# Altium PCB ublox_gnss_node.PcbDoc (part 3 of 5)
Units mm, origin at the board's own origin, x right, y up, seen from the top; angles counter-clockwise.
Board outline 84 x 108.04 mm, 6 copper layers (Top Layer (HSig), L2 GND, L3 Signal X, L4 PWR, L5 GND, Bottom Layer (Y)), stack 1.538 mm thick; 222 components, 159 nets, 892 pads, 1025 vias.
Unrouted connection lines stored in the file: 345.
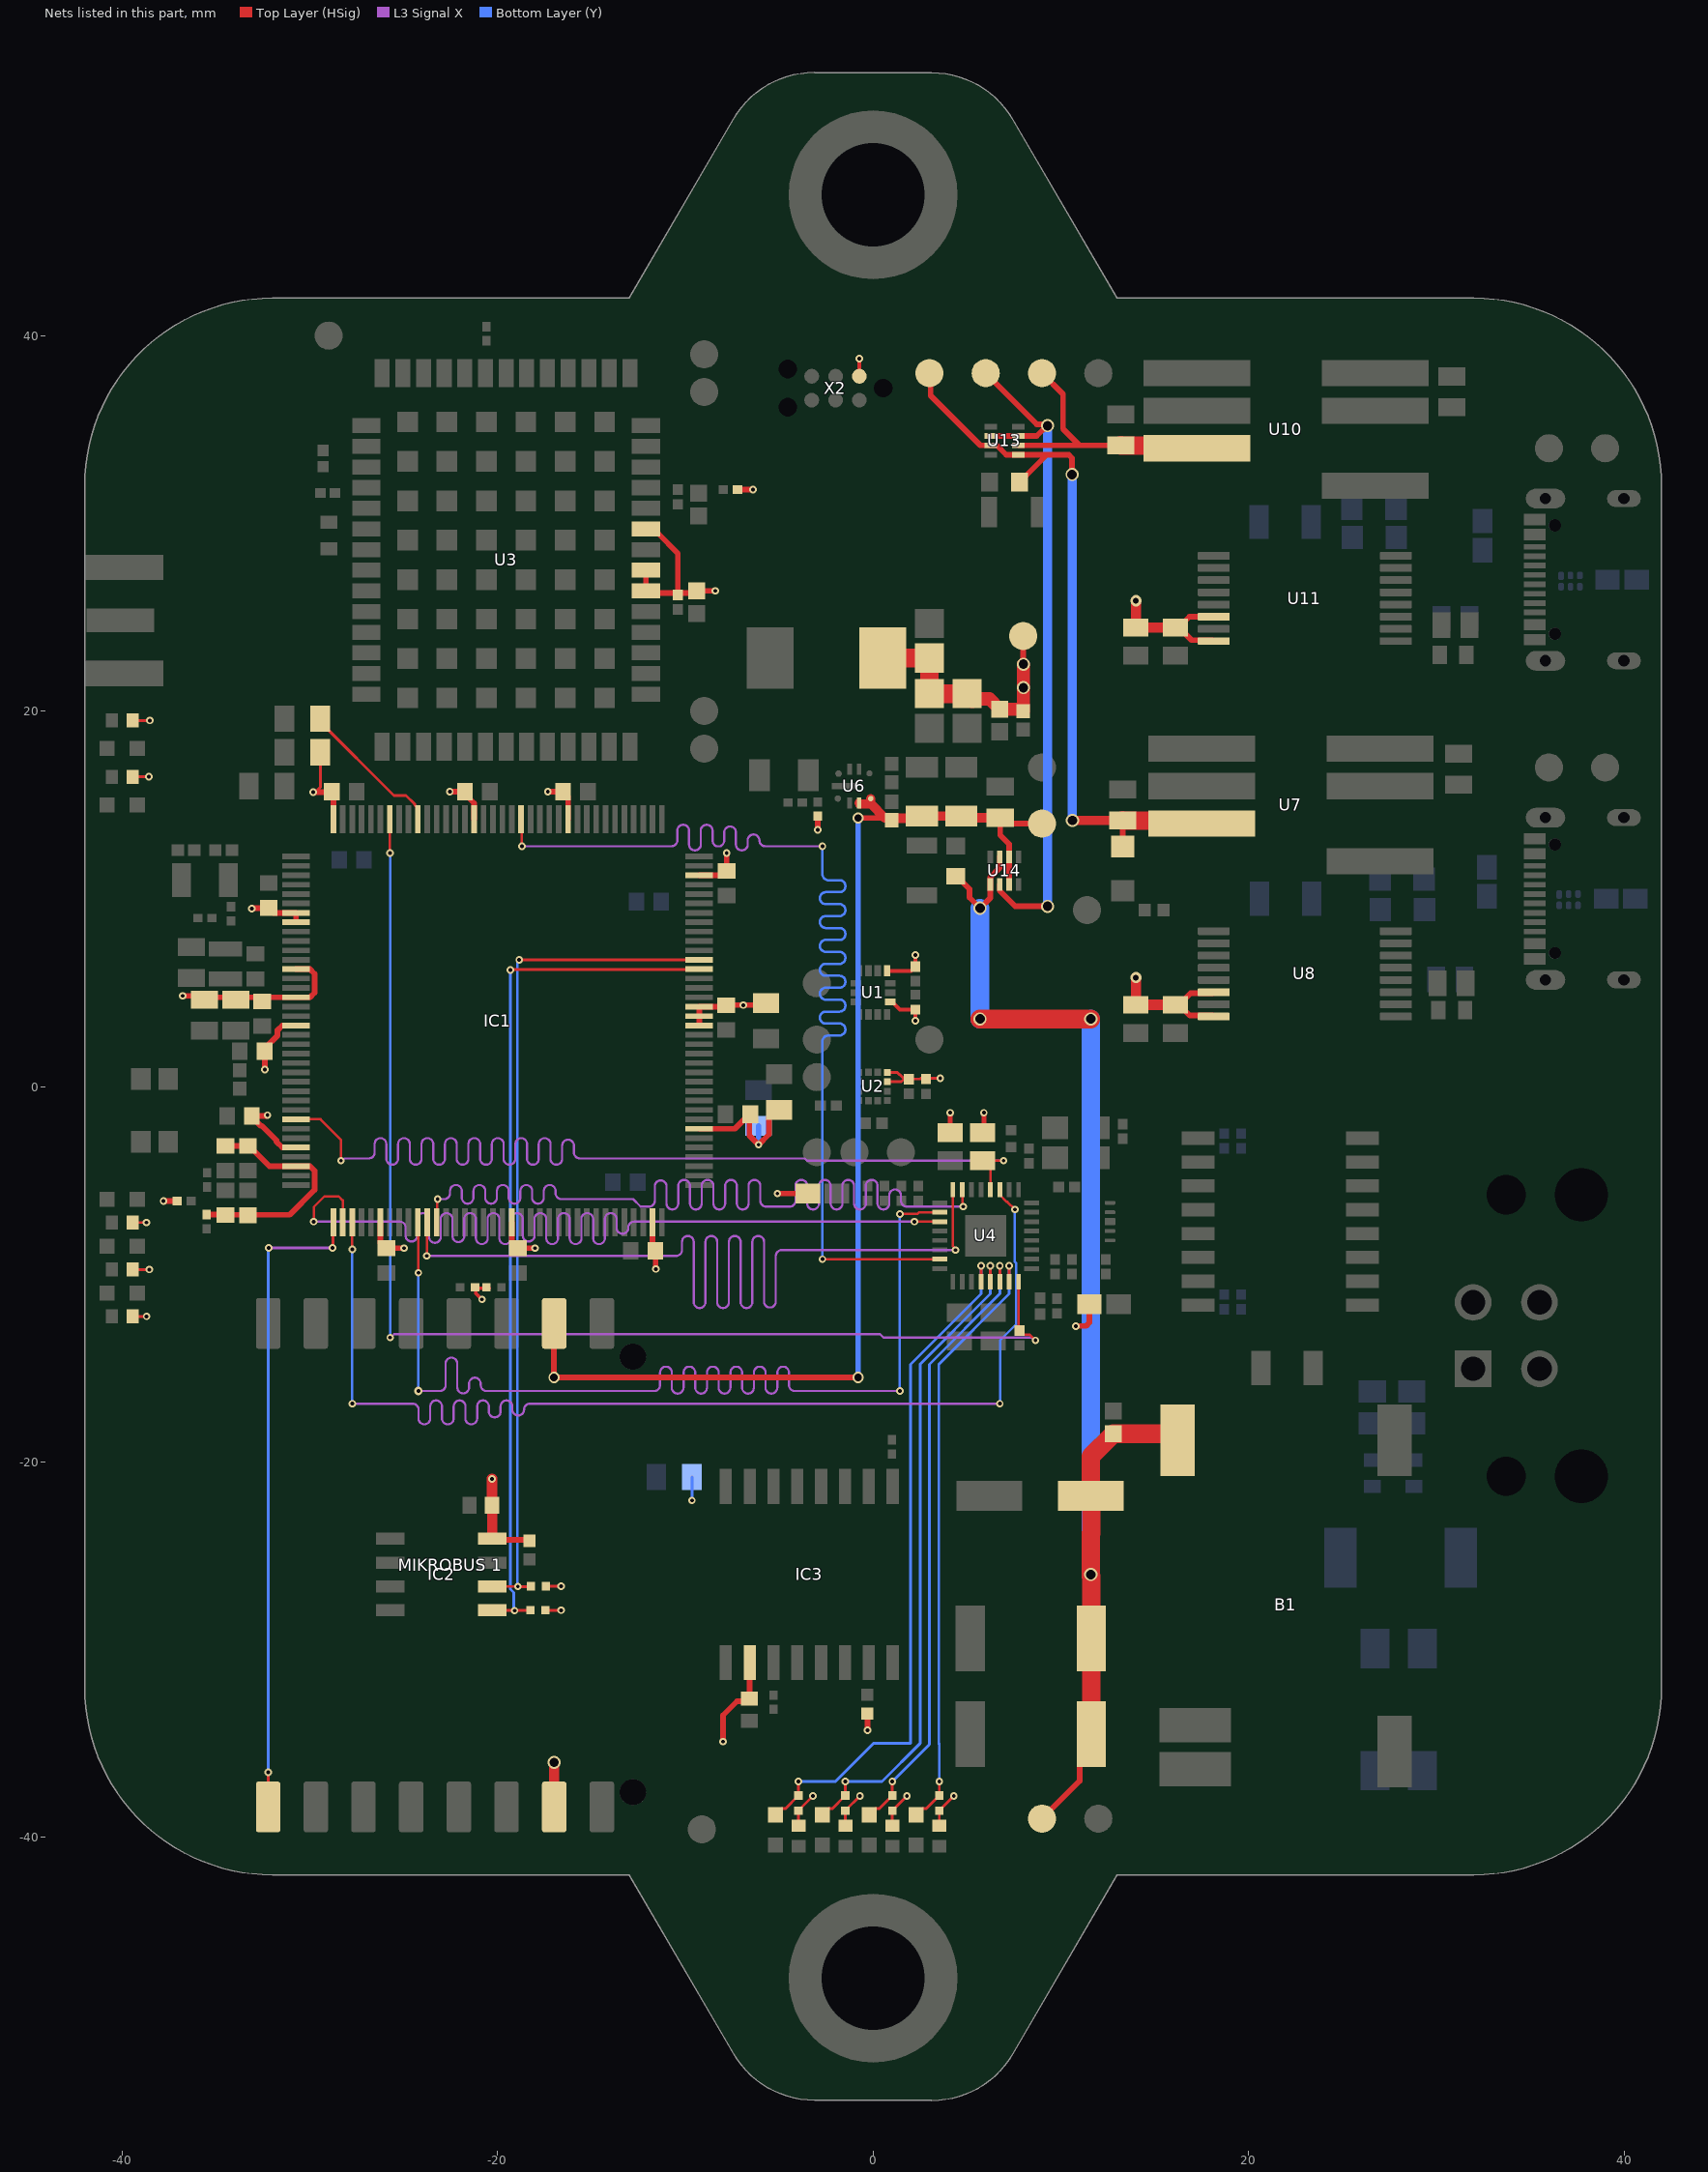
[diagram p6: the nets of this part, all layers, seen from the top]

## Part data (continued)
SW1: library part CMP-2000-06231-1, "Light Touch Switch, 100 mOhm, -40 to 85 degC, 4-Pin SMD, RoHS, Tape and Reel", Actuator Color=Black, Contact Rating @ Voltage=0.02@1+5VDCA, Dielectric Strength=250VAC, Manufacturer=Panasonic, Maximum AC Voltage Rating=N/A, Maximum Contact Resistance=100mOhm, Maximum DC Voltage Rating=1+5V, Minimum Insulation Resistance=100MOhm, Operating Force=1N, Operating Temperature=-40to85C, Package Description="4-Pin Surface Mount Device, Body 2.9 x 3.5 mm, Pitch 1.45 mm", Package Reference=EVPAA, Supplier Part Number=P13347SDKR-ND, Actuator Length=0.3mm, Actuator Style=RectangularButton, Base Material=N/A, Body Orientation=Straight, Category="Tactile Switches", ComponentLink1Description=https://datasheet.ciiva.com/24076/atk0000pe184-69004-24076293.pdf?src-supplier=Mouser, ComponentLink1URL=https://datasheet.ciiva.com/24076/atk0000pe184-69004-24076293.pdf?src-supplier=Mouser, ComponentLink2Description=https://datasheet.ciiva.com/2899/atk0000ce26-2899990.pdf?src-supplier=Digikey, ComponentLink2URL=https://datasheet.ciiva.com/2899/atk0000ce26-2899990.pdf?src-supplier=Digikey, ComponentLink3Description=https://datasheet.ciiva.com/2899/atk0000ce26-2899991.pdf?src-supplier=Digikey, ComponentLink3URL=https://datasheet.ciiva.com/2899/atk0000ce26-2899991.pdf?src-supplier=Digikey, ComponentLink4Description=https://datasheet.ciiva.com/2899/atk0000ce26-2899992.pdf?src-supplier=Digikey, ComponentLink4URL=https://datasheet.ciiva.com/2899/atk0000ce26-2899992.pdf?src-supplier=Digikey, Contact Material=N/A, Contact Plating=N/A, COO=JP, Datasheet URL=https://industrial.panasonic.com/cdbs/www-data/pdf/ATV0000/ATV0000C1.pdf, Datasheet Version=04/2016, Dimension=4.3x2.9x1.7mm, ECCN=EAR99, Electrical Life=1000000Cycles, Family=EVPAA, Ground Terminal=No, Housing Material=N/A, HTS=8507204000, Illumination Type=N/R, Manufacturer Part Number=EVP-AA002K, Manufacturer URL=http://www.panasonic.com/, Mechanical Life=N/A, Mounting=SurfaceMount,J-Bend, Mounting Technology=SurfaceMount, Packaging=EmbossedTapeandReel, Part No=EVP-AA002K, Pole Throw Configuration=SPST, Pricing="1=0.8, 10=0.774, 25=0.744, 100=0.6459, 250=0.5894, 500=0.54772, 1000=0.49116, 2500=0.46139 (USD)", Product Weight=N/A, RoHS=Yes, Seal Description=N/A, Seal Location=N/A, Stock=749, Supplier=PanasonicIndustrialDevices, Supplier Standard Pack=5,000, Switch Configuration=N.O., Type=LightTouch
T1: "Telecom Transformer 1: 1 1.4Ohm Prim. DCR 1Ohm Sec. DCR 16 Terminal Gull Wing SMD Automotive", Manufacturer=Bourns, Max Operating Temperature=125°C, Min Operating Temperature=-40°C, Supplier Part Number=118-SM91072AL-ECT-ND, Category=Uncategorized, ComponentLink1Description=http://www.farnell.com/datasheets/2169310.pdf?src-supplier=Farnell, ComponentLink1URL=http://www.farnell.com/datasheets/2169310.pdf?src-supplier=Farnell, ComponentLink2Description=https://www.bourns.com/docs/Product-Datasheets/sm13072apel.pdf?src-supplier=Digi-Key, ComponentLink2URL=https://www.bourns.com/docs/Product-Datasheets/sm13072apel.pdf?src-supplier=Digi-Key, ComponentLink3Description=http://www.farnell.com/datasheets/2169310.pdf?src-supplier=Newark, ComponentLink3URL=http://www.farnell.com/datasheets/2169310.pdf?src-supplier=Newark, Manufacturer Part Number=SM91072AL, Mounting Technology="Surface Mount", Pricing="1=4.72, 10=3.828, 25=3.0952, 50=2.8998, 100=2.7695, 250=2.68808 (USD)", RoHS=Yes, Series="Automotive, AEC-Q200, SM", Stock=2173, Supplier=Digikey, Supplier 1=Digikey, Supplier Part Number 1=118-SM91072AL-ECT-ND, Turns Ratio=1:1
U1: library part CMP-12177-000014-1, "INEMO INERTIAL MODULE: ALWAYS-ON", Manufacturer=STMicroelectronics, Supplier Part Number=497-19784-6-ND, Category="Inertial Measurement Units (IMUs)", ComponentLink1Description=https://datasheet.octopart.com/ISM330DHCXTR-STMicroelectronics-datasheet-153441497.pdf?src-supplier=Element14, ComponentLink1URL=https://datasheet.octopart.com/ISM330DHCXTR-STMicroelectronics-datasheet-153441497.pdf?src-supplier=Element14, ComponentLink2Description=https://www.st.com/resource/en/datasheet/ism330dhcx.pdf?src-supplier=Digikey, ComponentLink2URL=https://www.st.com/resource/en/datasheet/ism330dhcx.pdf?src-supplier=Digikey, ComponentLink3Description=https://datasheet.octopart.com/ISM330DHCXTR-STMicroelectronics-datasheet-142139761.pdf?src-supplier=Future+Electronics, ComponentLink3URL=https://datasheet.octopart.com/ISM330DHCXTR-STMicroelectronics-datasheet-142139761.pdf?src-supplier=Future+Electronics, Manufacturer Part Number=ISM330DHCXTR, Pricing="1=10.35, 10=8.282, 25=7.6608, 100=6.6256, 500=6.2115, 1000=5.7974 (USD)", RoHS=Yes, Stock=20451, Supplier=Digikey
U2: library part CMP-2000-07465-2, "IMU ACCEL/MAG I2C/SPI 12LGA", Manufacturer=STMicroelectronics, Max Supply Voltage=3.6V, Min Supply Voltage=1.71V, Operating Supply Current=3.7-200uA, Package=LGA-12-8487206, Temperature="-40°C to +85°C", Temperature Range High=+85°C, Temperature Range Low=-40°C, Accel Range=2/4/8/16g, Accel Resolution=16bits, Automotive=No, Category=IC, ComponentLink2Description=Datasheet, ComponentLink2URL=https://www.st.com/resource/en/datasheet/lsm303agr.pdf, Device Class L1=Sensors, Device Class L2="Motion Sensors", Device Class L3="Inertial Measurement Units (IMUs)", Digikey Description="IMU ACCEL/MAG I2C/SPI 12LGA", Footprint Url=https://www.st.com/content/ccc/resource/technical/document/technical_note/73/17/9c/16/dd/96/4a/01/CD00134799.pdf/files/CD00134799.pdf/jcr:content/translations/en.CD00134799.pdf, Height=1mm, Lead Free=Yes, Mag Sense Range="49.152gauss (g)", Manufacturer Part Number=LSM303AGRTR, Mouser Description="IMUs - Inertial Measurement Units Ultra-compact high-performance e-compass 3D accelerometer and 3D magnetometer module", Octopart=https://octopart.com/lsm303agrtr-stmicroelectronics-59386630, Resolution=16bits, RoHS=TRUE, Sensor Output=I2C,SPI, Sensor Type=Temperature,Accelerometer,Magnetometer
U3: "u-blox X20 all-band GNSS High Precision module LGA, 250 pcs/reel", Current - Receiving=-, Frequency="1.2276GHz, 1.575GHz", Manufacturer=u-blox, Operating Temperature="-40°C ~ 85°C", Package / Case="54-SMD Module", Part Number=ZED-F9P-00B, Supplier Device Package="54-LGA (22x17)", Supplier Part Number=672-ZED-X20P-00BCT-ND, Voltage - Supply="2.7V ~ 3.6V", Antenna Connector=-, Applications="General Purpose", Category="RF Receivers, Transceivers", Data Interface="I²C, SPI, UART, USB", Data Rate (Max)=921.6kbps, Features=-, Introduction Date=2025-05-22, Lifecycle Status=Production, Manufacturer Part Number=ZED-X20P-00B, Memory Size=-, Modulation or Protocol="BeiDou, Galileo, GLONASS, GNSS, GPS", Mounting Type="Surface Mount", Pricing="1=177.3 (USD)", REACH SVHC=Yes, RoHS=Compliant, Sensitivity=-167dBm, Series=ZED-F9P, Stock=250, Supplier=DigiKey
U4: "Ethernet Transceiver, 1-Trnsvr, PQCC32", Manufacturer="Texas Instruments", Supplier Part Number=296-DP83826ERHBRCT-ND, Supplier Part Number 1=595-DP83826ERHBR, Category="Ethernet Interface ICs", ComponentLink1Description=https://www.ti.com:443/lit/ds/symlink/dp83826e.pdf?src-supplier=IHS+Markit, ComponentLink1URL=https://www.ti.com:443/lit/ds/symlink/dp83826e.pdf?src-supplier=IHS+Markit, ComponentLink2Description=http://www.ti.com/general/docs/suppproductinfo.tsp?distId=10&amp;gotoUrl=http%3A%2F%2Fwww.ti.com%2Flit%2Fgpn%2Fdp83826e&src-supplier=Digikey, ComponentLink2URL=http://www.ti.com/general/docs/suppproductinfo.tsp?distId=10&amp;gotoUrl=http%3A%2F%2Fwww.ti.com%2Flit%2Fgpn%2Fdp83826e&src-supplier=Digikey, Manufacturer Part Number=DP83826ERHBR, Pricing="1=3.1, 10=2.321, 25=2.1264, 100=1.9128, 250=1.81096, 500=1.74958, 1000=1.69905 (USD)", RoHS=Yes, Stock=2127, Supplier=Digikey, Supplier 1=Mouser, Supplier 2=Digikey, Supplier Part Number 2=296-DP83826ERHBRCT-ND
U5: library part CMP-04985-000004-1, "TVS DIODE 5.5V 14V 10USON", Ambient Temperature Range High=+125°C, Ambient Temperature Range Low=-40°C, Breakdown Voltage=6.4V, Capacitance=0.5pF, Clamping Voltage=14V, Manufacturer="Texas Instruments", Operating Supply Voltage=5.5V, Package=DQA0010A, Peak Pulse Current=2.5A, Peak Pulse Power=2.5W, Temperature="-40°C to +125°C", Automotive=Yes, Automotive Grade="Grade 1", Category=IC, ComponentLink2Description=Datasheet, ComponentLink2URL=http://www.ti.com/lit/ds/symlink/tpd4e05u06-q1.pdf, Device Class L1="Circuit Protection", Device Class L2="ESD and Circuit Protection ICs", Device Class L3=unset, Digikey Description="TVS DIODE 5.5V 14V 10USON", Direction=Unidirectional, Height=0.55mm, Interface=USB,Ethernet,LVDS,Other, Lead Free=Yes, Manufacturer Part Number=TPD4E05U06QDQARQ1, Mouser Description="Automotive 4-Channel ESD Protection Solution for SuperSpeed (up to 5 Gbps) Interface 10-USON -40 to 125", Number of Channels=4, Octopart=https://octopart.com/tpd4e05u06qdqarq1-texas+instruments-48523459, Reverse Standoff Voltage=5.5V, RoHS=TRUE, Standoff Height=0mm, Temperature Range High=+125°C, Temperature Range Low=-40°C
U6: "Integrated Circuit", Manufacturer_Name="Texas Instruments", Datasheet Link=https://www.ti.com/lit/ds/symlink/lmr43610-q1.pdf, Height=1mm, Manufacturer Part Number=LMR43620MC3RPERQ1
U7 U10: "TDN 5-0911WISM DC-DC Converter, 5V, 1A; No. of Outputs: 1 Output; Output Power Max: 5W; Voltage - 1: 5V; Current 1: 1A;", Output Power=5W, Supplier Part Number=TDN5-0911WISM-ND, Height=10.2mm, NexarPartId=76519263, Number of Outputs=1, RoHS=Compliant, Supplier=DigiKey, Width=9.1mm
U8 U11: "Low emissions, full and low speed isolated USB repeater 16-SSOP -40 to 125", Manufacturer="Texas Instruments", Supplier Part Number=296-ISOUSB111DWXRCT-ND, Manufacturer Part Number=ISOUSB111DWXR, Pricing="1=10.29, 10=9.294, 25=8.8616, 100=7.6946, 250=7.34876, 500=6.70034 (USD)", RoHS=No, Stock=317, Supplier=Digikey, Supplier 1=Digikey, Supplier Part Number 1=296-ISOUSB111DWXRCT-ND
U9 U12: library part CMP-0326-00038-4, "TVS DIODE 5.5V 6SON", Breakdown Voltage=24V, Capacitance=15pF, Max Operating Temperature=85°C, Max Power Dissipation=60W, Min Breakdown Voltage=6V, Min Operating Temperature=-40°C, Operating Supply Voltage=950mV, Package Quantity=5000, Peak Pulse Current=3A, Test Current=1mA, Working Voltage=19V, Depth=1mm, Direction=Unidirectional, ESD Protection=Yes, Height=0.55mm, Interface=USB, Lead Free="Lead Free", Length=1.45mm, Manufacturer Part Number=TPD4S012DRYR, Number of Channels=4, Number of Circuits=4, Number of Pins=6, Packaging="Tape and Reel", Peak Pulse Power=60W, Polarity=Unidirectional, Radiation Hardening=No, REACH SVHC="No SVHC", Termination=SMD/SMT, Width=1.05mm
U13 U14: "1.6-V to 5.5-V, 40-mâ„", Manufacturer Name="Texas Instruments", Copyright="Copyright (C) 2026 Ultra Librarian. All rights reserved.", Manufacturer Part Number=TPS2116DRLR, RefDes=RefDes, Type=TYPE
X1: "Conn Circular F 4 POS Solder RA Panel Mount 4 Terminal 1 Port", Manufacturer=Amphenol, Supplier Part Number 1=4995-M12D-04PFFR-SF7003-ND, ComponentLink1Description=http://www.amphenolltw.com/2012download/2D%20PDF/03_M%20Series%20Sensor%20Connectors/M12D-04PFFR-SF7003.pdf?src-supplier=Digi-Key, ComponentLink1URL=http://www.amphenolltw.com/2012download/2D%20PDF/03_M%20Series%20Sensor%20Connectors/M12D-04PFFR-SF7003.pdf?src-supplier=Digi-Key, Manufacturer Part Number=M12D-04PFFR-SF7003, Pricing 1="10=8.15600 (USD)", RoHS=No, Supplier 1=Digikey
X2: library part 6-Pin_Needle_Programmer, "CABLE, TAG CONNECT, WITH OUT LEG, FOR IC", Package Quantity=1, Lead Free="Lead Free", Number of Pins=6, Packaging=Bulk, REACH SVHC="No SVHC"
Y1: "Crystal or Oscillator - 6pF Load", Arrow Part Number=NX3215SA-32.768K-STD-MUA-8, Manufacturer_Name=NDK, Mouser Part Number=344-NX3215SA32768K8, Arrow Price/Stock=https://www.arrow.com/en/products/nx3215sa32.768kstdmua8/ndk, Datasheet Link=https://www.arrow.com/en/products/nx3215sa32.768kstdmua8/ndk, Height=0.9mm, Manufacturer Part Number=NX3215SA-32.768K-STD-MUA-14, Mouser Price/Stock=https://www.mouser.co.uk/ProductDetail/NDK/NX3215SA-32.768K-STD-MUA-8?qs=55YtniHzbhBdnrw6egvs7Q%3D%3D, Supplier 1=Mouser, Supplier Part Number 1=344-NX3215SA32768K8
Y2: library part CMP-27762-004325-2, "Crystal 25MHz ±20ppm (Tol) ±50ppm (Stability) 12pF FUND 50Ω Automotive 4-Pin Ultra Mini-CSMD T/R", Case/Package=SMD/SMT, ESR (Equivalent Series Resistance)=50R, Frequency=25MHz, Frequency Stability=50ppm, Frequency Tolerance=20ppm, Load Capacitance=12pF, Max Operating Temperature=125°C, Min Operating Temperature=-40°C, Ratings=AEC-Q200, Height=0.031inch, Length=0.126inch, Manufacturer Part Number=ABM8AIG-25.000MHZ-12-2Z-T3, Mount="Surface Mount", Packaging="Cut Tape", RoHS Compliant=Yes, Series=ABM8AIG, Width=0.098inch

## Free pads (board coordinates)
  round 9 hole 5.5: 2(0,-47.5) 2(0,47.5)

## Via types
v1: diameter 0.4, hole 0.2, Top Layer (HSig) to Bottom Layer (Y), tented both sides, 916 vias
v2: diameter 0.45, hole 0.2, Top Layer (HSig) to Bottom Layer (Y), tented both sides, 53 vias
v3: diameter 0.6, hole 0.3, Top Layer (HSig) to Bottom Layer (Y), tented both sides, 35 vias
v4: diameter 0.7, hole 0.5, Top Layer (HSig) to Bottom Layer (Y), tented both sides, 13 vias
v5: diameter 0.6, hole 0.4, Top Layer (HSig) to Bottom Layer (Y), tented both sides, 8 vias

## Nets (pads, with @x,y where several pads share a name; then routed paths per layer and width w, separated by ;. In a path a pad name is that pad's centre, name@x,y a point inside that pad or via, vN(x,y) a via of type N, cw(c..) or ccw(c..) an arc to the next point about the centre after c; other vN are vias at no path point)
+3V3: "MIKROBUS 1.7" *13.1 C1.2 C2.2 C3.2 C4.2 C8.2 C9.2 C14.2 C15.2 C16.2 C17.2 C18.2 C19.2 C20.2 C21.2 C22.2 C23.2 C24.2 C25.2 C32.2 C33.2 C60.2 C61.2 C62.2 C64.2 C71.1 C72.1 C79.1 C80.1 C82.1 C83.1 C86.2 C87.2 FB1.2 FB2.2 IC1.7 IC1.8 IC1.13 IC1.16 IC1.19 IC1.32 IC1.42 IC1.56 IC1.71 IC1.79 IC1.90 IC1.91 IC1.92 IC1.106 IC1.119 IC1.129 IC1.144 IC2.8 IC3.2 L3.2 R4.2 R5.2 R6.2 R7.2 R8.2 R9.2 R10.2 R11.2 R12.2 R13.2 R16.1 R19.2 R20.2 R21.2 R23.2 R24.2 R25.2 R26.2 R28.2 R31.1 R35.2 R38.2 R44.2 R48.2 R49.2 R58.2 R59.2 R60.2 R61.2 U1.5 U1.8 U2.9 U2.10 U3.33 U3.34 U3.36 U8.14 U8.16 U11.14 U11.16 X2.1 | length 138.3
  Top Layer (HSig) w0.15: R12.2@-39.45,-12.25 -39.448,-12.248 v1(-38.702,-12.248) ; R11.2@-39.45,-9.75 v1(-38.55,-9.75) ; R10.2@-39.45,-7.25 -39.449,-7.249 v1(-38.713,-7.249) ; R7.2@-39.45,16.5 v1(-38.575,16.5) ; R5.2@-39.45,19.5 v1(-38.525,19.5) ; v1@-29.693,15.7 -29.45,15.943 R13.2@-29.45,17.7 ; R20.2@-17.557,-26.625 v1(-16.625,-26.625) ; R19.2@-17.5,-27.9 v1(-16.625,-27.9) ; R8.2@-3.975,-39.375 R60.2@-3.975,-38.575 v1(-3.2,-37.8) ; R9.2@-1.475,-39.375 R61.2@-1.475,-38.575 v1(-0.7,-37.8) ; U2.9@0.763,0.25 1.51,0.25 C3.2@1.65,0.39 ; U2.10@0.763,0.75 1.29,0.75 1.42,0.62 1.44,0.62 1.65,0.41 C3.2@1.65,0.39 ; R4.2@1.025,-39.375 R58.2@1.025,-38.575 v1(1.8,-37.8) ; R6.2@3.525,-39.375 R59.2@3.525,-38.575 v1(4.3,-37.8) ; v1(3.581,0.432) 2.532,0.432 2.5,0.4 1.66,0.4 C3.2@1.65,0.39
  Top Layer (HSig) w0.2: R23.2@-21.2,-10.7 -21.166,-10.734 -21.166,-11.025 -20.85,-11.341 v1(-20.835,-11.341) ; R23.2@-21.175,-10.75 R21.2@-20.45,-10.75 ; X2.1@-0.73,37.835 v1(-0.73,38.77) ; U1.8@0.75,6.162 2.022,6.162 2.12,6.26 2.14,6.26 2.25,6.37 C2.2@2.25,6.39 v1(2.25,7) ; U1.5@0.913,4.5 1.025,4.5 1.425,4.1 C1.2@2.25,4.1 v1(2.25,3.5)
  Top Layer (HSig) w0.25: R31.1@4.1,-2.45 v1(4.1,-1.4) ; R35.2@5.9,-2.45 v1(5.9,-1.4)
  Top Layer (HSig) w0.3: v1(-37.8,-6.1) R16.1@-37.075,-6.1 ; v1(-36.775,4.825) -35.405,4.825 -35.2,4.62 -35.07,4.75 IC1.16@-30.738,4.75 -29.997,4.75 -29.75,4.996 -29.75,6.004 -29.997,6.25 IC1.13@-30.738,6.25 ; v1(-33.1,9.475) -33.081,9.494 -32.221,9.494 C14.2@-32.2,9.515 -31.935,9.25 IC1.7@-30.738,9.25 IC1.8@-30.738,8.75 ; C23.2@-33.09,-1.63 -32.62,-2.1 -32.561,-2.1 -31.786,-2.875 -31.786,-2.943 -31.479,-3.25 IC1.32@-30.738,-3.25 ; C23.2@-33.09,-1.575 -32.337,-1.575 -32.288,-1.526 v1(-32.261,-1.526) ; C24.2@-32.415,1.975 -32.407,1.967 -32.407,0.907 v1(-32.4,0.9) ; C24.2@-32.415,2.03 -31.726,2.719 -31.726,3.003 -31.479,3.25 IC1.19@-30.738,3.25 ; v1(-29.825,15.675) -28.86,15.675 C86.2@-28.835,15.7 -28.75,15.615 IC1.144@-28.75,14.238 ; IC1.42@-26.25,-7.238 -26.25,-7.826 -26.245,-7.83 -26.245,-8.35 -25.98,-8.615 C22.2@-25.925,-8.615 v1(-24.985,-8.615) ; v1(-22.55,15.7) C16.2@-21.81,15.7 ; C16.2@-21.81,15.645 -21.25,15.085 IC1.129@-21.25,14.238 ; IC2.8@-20.288,-24.095 -20.235,-24.147 -18.352,-24.147 R48.2@-18.3,-24.2 ; IC1.56@-19.25,-7.238 -19.25,-8.4 -18.985,-8.665 C21.2@-18.95,-8.665 ; C21.2@-18.925,-8.615 v1(-18.01,-8.615) ; v1(-17.325,15.7) C17.2@-16.51,15.7 -16.25,15.44 IC1.119@-16.25,14.238 ; U3.34@-12.1,27.5 U3.33@-12.1,26.4 -11.995,26.295 -9.506,26.295 C8.2@-9.4,26.401 v1(-8.401,26.401) ; U3.36@-12.1,29.7 -11.85,29.45 -11.446,29.45 -10.4,28.404 C9.2@-10.4,26.19 ; IC1.71@-11.75,-7.238 -11.75,-8.59 -11.582,-8.758 -11.582,-9.718 v1(-11.575,-9.725) ; IC1.79@-9.262,-2.25 -7.36,-2.25 C87.2@-6.59,-1.48 ; IC1.90@-9.262,3.25 IC1.91@-9.262,3.75 IC1.92@-9.262,4.25 -7.895,4.25 C19.2@-7.825,4.32 ; IC1.106@-9.262,11.25 -8.035,11.25 C18.2@-7.8,11.485 v1(-7.8,12.431) ; v1(-8,-34.9) -8,-33.5 -7.25,-32.75 -6.75,-32.75 C83.1@-6.6,-32.6 -6.575,-32.575 IC3.2@-6.575,-30.69 ; C19.2@-7.825,4.335 v1(-6.91,4.335) -5.815,4.335 R25.2@-5.7,4.45 ; R44.2@-7.225,31.8 v1(-6.4,31.8) ; C87.2@-6.59,-1.425 C87.2@-6.59,-1.48 ; v1(-5.1,-5.7) FB2.2@-3.476,-5.7 ; R26.2@-5,-1.25 -5.175,-1.25 -5.55,-1.625 -5.55,-2.55 v1(-6.1,-3.1) -6.59,-2.61 C87.2@-6.59,-1.48 ; v1(-2.95,13.675) R38.2@-2.95,14.4 ; v1(-0.3,-34.3) R49.2@-0.3,-33.4 ; C64.2@8,19.99 C64.2@8.005,19.995 ; v4(8,22.5) *13.1@8,24.5 ; v1(10.8,-12.774) 10.819,-12.755 11.348,-12.755 11.524,-12.579 FB1.2@11.524,-11.6 ; C71.1@16.1,4.35 C71.1@16.3,4.35 ; U8.16@18.15,3.725 18.095,3.78 16.87,3.78 C71.1@16.3,4.35 ; U8.14@18.15,5.025 18.095,4.97 16.92,4.97 C71.1@16.3,4.35 ; U11.16@18.15,23.725 18.095,23.78 16.97,23.78 16.3,24.45 16.625,24.775 16.625,24.8 16.85,25.025 U11.14@18.15,25.025
  Top Layer (HSig) w0.55: v1(-20.3,-20.9) C82.1@-20.3,-22.3 -20.294,-22.306 -20.294,-24.089 IC2.8@-20.288,-24.095 ; -16.988,-38.38 v4(-16.988,-36.012) ; v3(14,5.8) C72.1@14,4.35 C71.1@16.1,4.35 ; v3(14,25.875) C80.1@14,24.45 C79.1@16.1,24.45
  Top Layer (HSig) w0.6: C64.2@7.889,20.101 C64.2@8,19.99
  Top Layer (HSig) w0.7: C60.2@5.275,20.65 6.201,20.65 C62.2@6.75,20.101 C64.2@7.889,20.101 ; C64.2@8,19.99 v4(8,21.245) v4(8,22.5)
  Top Layer (HSig) w1: L3.2@0.525,22.825 C61.2@3,22.825 C15.2@3,20.925 C60.2@5,20.925 C60.2@5.275,20.65
  Bottom Layer (Y) w0.15: v1(-9.65,-22.05) R24.2@-9.65,-20.8
  Bottom Layer (Y) w0.3: v1(-6.1,-3.1) R28.2@-6.1,-2.1
+5V: "MIKROBUS 1.10" *28.1 C56.2 C57.2 C58.2 C59.1 U6.3 U6.4 U14.2 U14.7 | length 64.9
  Top Layer (HSig) w0.3: -16.988,-12.62 -17,-12.632 v5(-17,-15.5) v5(-0.8,-15.5) ; v5@-0.743,14.243 v5(-0.8,14.3) 0.6,14.3 0.615,14.315 ; C59.1@0.818,14.243 C59.1@0.89,14.315 ; C57.2@4.7,14.4 C57.2@4.78,14.32 ; U14.7@7.25,10.76 U14.2@7.25,12.24 7.25,12.91 6.775,13.385 C56.2@6.775,14.32 7.095,14 *28.1@9,14
  Top Layer (HSig) w0.5: U6.3@-0.75,15.1 -0.703,15.053 -0.123,15.053 ; U6.4@-0.123,15.339 -0.123,15.053 ; C57.2@4.7,14.4 C58.2@2.6,14.4 2.492,14.292 1.107,14.292 C59.1@1,14.185 1,14.205 0.89,14.315 0.615,14.315 -0.123,15.053 ; C57.2@4.78,14.32 C56.2@6.775,14.32
  Bottom Layer (Y) w0.3: v5(-0.8,-15.5) v5(-0.8,14.3)
+5V_POE: *25.1 B1.1 C84.1 C85.2 R52.2 R53.2 R55.1 U14.3 U14.5 | length 72.5
  Top Layer (HSig) w0.3: R55.1@4.4,11.2 4.45,11.2 5.134,10.516 5.134,10.066 v4(5.7,9.5) 6.25,10.05 U14.5@6.25,10.76 6.25,11.15 6.75,11.65 U14.3@6.75,12.24 ; *25.1@9,-39 11,-37 11,-35.125 R53.2@11.625,-34.5
  Top Layer (HSig) w1: v4(5.7,3.6) v4(11.6,3.6) ; v4@11.6,-26.1 11.6,-23.8 ; R53.2@11.625,-34.5 R52.2@11.625,-29.4 v4@11.625,-26.1 ; 11.625,-23.8 11.625,-21.825 C84.1@11.6,-21.8 11.6,-19.701 C85.2@12.8,-18.501 15.866,-18.501 B1.1@16.21,-18.845
  Bottom Layer (Y) w1: v4(5.7,3.6) v4(5.7,9.5) ; v4(11.6,-26) v4(11.6,3.6)
+5V_USB: *27.1 U13.2 U13.7 U14.6 | length 36.6
  Top Layer (HSig) w0.3: *27.1@6,38 8.723,35.277 9.223,35.277 v4(9.3,35.2) 9.269,35.2 8.719,34.65 U13.2@6.26,34.65 ; U14.6@6.75,10.76 6.75,10.421 7.571,9.6 v4(9.3,9.6)
  Bottom Layer (Y) w0.5: v4(9.3,9.6) v4(9.3,35.2)
+5V_USB_GNSS: *29.1 C75.2 U10.7 U13.6 | length 14.3
  Top Layer (HSig) w0.3: U13.6@7.74,34.15 11,34.15 ; *29.1@9,38 10.115,36.885 10.115,35.035 11,34.15 ; C75.2@13.2,34.16 13.19,34.15 11,34.15
  Top Layer (HSig) w1: C75.2@13.2,34.16 13.22,34.14 17.11,34.14 U10.7@17.25,34
+5V_USB_MCU: *26.1 C67.2 R40.1 R54.1 U7.7 U13.3 U13.5 | length 40.8
  Top Layer (HSig) w0.3: *26.1@2.931,37.931 *26.1@3,38 3.064,37.936 3.064,36.8 5.714,34.15 U13.3@6.26,34.15 6.599,34.15 7.099,33.65 U13.5@7.74,33.65 9.25,33.65 ; R54.1@7.8,32.2 7.8,32.25 8.1,32.55 8.15,32.55 9.25,33.65 ; 10.1,33.65 9.25,33.65 ; v4(10.6,32.6) 10.6,33.474 10.424,33.65 9.25,33.65 ; R40.1@13.3,12.775 C67.2@13.3,14.18
  Top Layer (HSig) w0.5: v4(10.62,14.18) C67.2@13.3,14.18
  Top Layer (HSig) w1: C67.2@13.3,14.18 13.32,14.16 17.34,14.16 U7.7@17.5,14
  Bottom Layer (Y) w0.3: v4(10.6,32.6) v4@10.61,32.59 ; v4@10.61,14.19 v4(10.62,14.18)
  Bottom Layer (Y) w0.5: v4@10.61,14.19 v4@10.61,32.59
ADC: "MIKROBUS 1.1" IC1.37 | length 34.6
  Top Layer (HSig) w0.15: -32.228,-38.38 v1(-32.228,-36.528) ; v1(-28.8,-8.6) -28.775,-8.575 -28.775,-7.263 IC1.37@-28.75,-7.238
  L3 Signal X w0.15: v1(-32.2,-8.6) v1(-28.8,-8.6)
  Bottom Layer (Y) w0.15: v1(-32.228,-36.528) -32.228,-8.628 v1(-32.2,-8.6)
AGND: C10.1 C11.1 C12.1 C13.1 IC1.34 R18.2 | length 12.6
  Top Layer (HSig) w0.3: R18.2@-35.5,-6.825 -35.495,-6.83 -34.505,-6.83 -34.5,-6.835 -33.3,-6.835 -31.082,-6.835 -29.75,-5.504 -29.75,-4.496 -29.997,-4.25 IC1.34@-30.738,-4.25 -32.16,-4.25 -33.245,-3.165 C13.1@-33.3,-3.165 C12.1@-34.5,-3.165
BOOT0: IC1.135 R15.1 | length 7.9
  Top Layer (HSig) w0.15: R15.1@-29.45,19.6 -29.45,19.425 -25.525,15.5 -24.877,15.5 -24.425,15.048 -24.425,15.001 -24.25,14.826 IC1.135@-24.25,14.238
EEPROM_SCL: IC1.97 IC2.6 R20.1 | length 44.9
  Top Layer (HSig) w0.15: IC2.6@-20.288,-26.635 v1@-18.95,-26.635 ; v1@-18.923,-26.645 -18.408,-26.645 R20.1@-18.373,-26.61 ; v1(-18.85,6.75) IC1.97@-9.262,6.75
  Bottom Layer (Y) w0.15: v1@-18.95,-26.645 -18.95,6.65 v1(-18.85,6.75)
  other v1: -18.923,-26.635
EEPROM_SDA: IC1.96 IC2.5 R19.1 | length 46.2
  Top Layer (HSig) w0.15: IC2.5@-20.288,-27.905 v1@-19.15,-27.905 ; v1(-19.325,6.2) -19.3,6.225 -9.287,6.225 IC1.96@-9.262,6.25 ; v1@-19.1,-27.905 -18.355,-27.905 R19.1@-18.35,-27.9
  Bottom Layer (Y) w0.15: v1(-19.325,6.2) -19.325,-26.78 -19.15,-26.955 v1@-19.15,-27.925
  other v1: -19.1,-27.925
ETH_CRS_DV: IC1.46 U4.18 | length 64.1
  Top Layer (HSig) w0.128: IC1.46@-24.25,-7.238 -24.237,-7.251 -24.237,-9.912 v1(-24.225,-9.925) ; v1(1.425,-6.794) 2.363,-6.794 2.457,-6.7 U4.18@3.548,-6.7
  L3 Signal X w0.117: v2(-24.225,-16.225) -23.145,-16.225 -23.087,-16.225 ccw(c-23.087,-15.913) -22.775,-15.913 -22.775,-14.76 cw(c-22.463,-14.76) -22.15,-14.76 -22.15,-16.033 ccw(c-21.838,-16.033) -21.526,-16.033 -21.526,-15.828 cw(c-21.214,-15.828) -20.901,-15.828 -20.901,-15.913 ccw(c-20.589,-15.913) -20.589,-16.225 -18.045,-16.225 -11.718,-16.225 -11.66,-16.225 ccw(c-11.66,-15.913) -11.348,-15.913 -11.348,-15.239 cw(c-11.036,-15.239) -10.723,-15.239 -10.723,-16.045 ccw(c-10.411,-16.045) -10.099,-16.045 -10.099,-15.239 cw(c-9.787,-15.239) -9.474,-15.239 -9.474,-16.045 ccw(c-9.162,-16.045) -8.85,-16.045 -8.85,-15.239 cw(c-8.538,-15.239) -8.225,-15.239 -8.225,-16.045 ccw(c-7.913,-16.045) -7.601,-16.045 -7.601,-15.239 cw(c-7.289,-15.239) -6.976,-15.239 -6.976,-16.045 ccw(c-6.664,-16.045) -6.352,-16.045 -6.352,-15.239 cw(c-6.04,-15.239) -5.727,-15.239 -5.727,-16.045 ccw(c-5.415,-16.045) -5.103,-16.045 -5.103,-15.239 cw(c-4.791,-15.239) -4.478,-15.239 -4.478,-15.913 ccw(c-4.166,-15.913) -4.166,-16.225 -3.425,-16.225 v1(1.425,-16.225)
  Bottom Layer (Y) w0.128: v2(-24.225,-16.225) v1(-24.225,-9.925) ; v1(1.425,-16.225) v1(1.425,-6.794)
ETH_LED0: D1.1 R58.1 U4.30 | length 33.1
  Top Layer (HSig) w0.15: D1.1@-0.2,-38.8 0.125,-38.475 0.325,-38.475 R58.1@1.025,-37.775 v1(1.025,-37.025) ; U4.30@6.749,-10.401 v1(6.75,-9.55)
  Bottom Layer (Y) w0.15: v1(1.025,-37.025) 3,-35.05 3,-14.8 6.75,-11.05 v1(6.75,-9.55)
ETH_LED1: D3.1 R59.1 U4.31 | length 32.3
  Top Layer (HSig) w0.15: D3.1@2.3,-38.8 2.625,-38.475 2.825,-38.475 R59.1@3.525,-37.775 v1(3.525,-37.025) ; U4.31@7.249,-10.401 v1(7.25,-9.55)
  Bottom Layer (Y) w0.15: v1(3.525,-37.025) 3.525,-35.025 3.5,-35 3.5,-14.8 7.249,-11.051 v1(7.25,-9.55)
ETH_LED2: D5.1 R60.1 U4.28 | length 37.1
  Top Layer (HSig) w0.15: D5.1@-5.2,-38.8 -4.875,-38.475 -4.675,-38.475 R60.1@-3.975,-37.775 v1(-3.975,-37.025) ; U4.28@5.749,-10.401 v1@5.749,-9.551
  Bottom Layer (Y) w0.15: v1(-3.975,-37.025) -2.005,-37.025 0.02,-35 2,-35 2,-14.798 5.75,-11.048 v1(5.75,-9.55)
ETH_LED3: D6.1 R61.1 U4.29 | length 35.1
  Top Layer (HSig) w0.15: D6.1@-2.7,-38.8 -2.375,-38.475 -2.175,-38.475 R61.1@-1.475,-37.775 v1(-1.475,-37.025) ; U4.29@6.249,-10.401 v1(6.25,-9.55)
  Bottom Layer (Y) w0.15: v1(-1.475,-37.025) 0.475,-37.025 2.5,-35 2.5,-14.8 6.25,-11.05 v1(6.25,-9.55)
ETH_MDC: IC1.29 R35.1 U4.12 | length 62
  Top Layer (HSig) w0.128: IC1.29@-30.738,-1.75 -29.435,-1.75 -28.35,-2.835 v1(-28.35,-3.95) ; U4.12@6.249,-5.499 6.249,-4.374 R35.1@5.825,-3.95 v1(6.95,-3.95)
  L3 Signal X w0.117: v1(-28.35,-3.95) -28.273,-3.95 -28.155,-3.832 -26.925,-3.832 -26.867,-3.832 ccw(c-26.867,-3.519) -26.554,-3.519 -26.554,-3.062 cw(c-26.242,-3.062) -25.93,-3.062 -25.93,-3.854 ccw(c-25.618,-3.854) -25.305,-3.854 -25.305,-3.062 cw(c-24.993,-3.062) -24.681,-3.062 -24.681,-3.854 ccw(c-24.369,-3.854) -24.056,-3.854 -24.056,-3.062 cw(c-23.744,-3.062) -23.432,-3.062 -23.432,-3.854 ccw(c-23.12,-3.854) -22.807,-3.854 -22.807,-3.062 cw(c-22.495,-3.062) -22.183,-3.062 -22.183,-3.854 ccw(c-21.871,-3.854) -21.558,-3.854 -21.558,-3.062 cw(c-21.246,-3.062) -20.934,-3.062 -20.934,-3.854 ccw(c-20.622,-3.854) -20.309,-3.854 -20.309,-3.062 cw(c-19.997,-3.062) -19.685,-3.062 -19.685,-3.854 ccw(c-19.373,-3.854) -19.06,-3.854 -19.06,-3.062 cw(c-18.748,-3.062) -18.436,-3.062 -18.436,-3.854 ccw(c-18.124,-3.854) -17.811,-3.854 -17.811,-3.062 cw(c-17.499,-3.062) -17.187,-3.062 -17.187,-3.854 ccw(c-16.874,-3.854) -16.562,-3.854 -16.562,-3.148 cw(c-16.25,-3.148) -15.938,-3.148 -15.938,-3.519 ccw(c-15.625,-3.519) -15.625,-3.832 -12.875,-3.832 -3.627,-3.832 -3.508,-3.95 v1(6.95,-3.95)
ETH_MDIO: IC1.39 U4.11 | length 64.3
  Top Layer (HSig) w0.128: v1(-27.749,-8.676) IC1.39@-27.75,-7.238 ; U4.11@6.749,-5.499 6.749,-5.778 7.122,-6.151 7.151,-6.151 v1(7.55,-6.55)
  L3 Signal X w0.117: v1(-27.749,-16.899) -25.211,-16.899 -24.528,-16.899 cw(c-24.528,-17.211) -24.216,-17.211 -24.216,-17.684 ccw(c-23.904,-17.684) -23.591,-17.684 -23.591,-17.04 cw(c-23.279,-17.04) -22.967,-17.04 -22.967,-17.684 ccw(c-22.655,-17.684) -22.342,-17.684 -22.342,-17.04 cw(c-22.03,-17.04) -21.718,-17.04 -21.718,-17.684 ccw(c-21.406,-17.684) -21.093,-17.684 -21.093,-17.04 cw(c-20.781,-17.04) -20.469,-17.04 -20.469,-17.314 ccw(c-20.156,-17.314) -19.844,-17.314 -19.844,-17.04 cw(c-19.532,-17.04) -19.22,-17.04 -19.22,-17.211 ccw(c-18.907,-17.211) -18.595,-17.211 cw(c-18.283,-17.211) -18.283,-16.899 -4.425,-16.899 v1(6.749,-16.899)
  Bottom Layer (Y) w0.128: v1(-27.749,-16.899) v1(-27.749,-8.676) ; v1(6.749,-16.899) 6.764,-16.884 6.764,-13.53 7.614,-12.68 7.614,-9.399 7.55,-9.335 v1(7.55,-6.55)
ETH_REF_CLK: IC1.38 U4.19 | length 61.9
  Top Layer (HSig) w0.128: v1(-29.8,-7.2) -29.8,-6.425 -29.225,-5.85 -28.475,-5.85 -28.25,-6.075 IC1.38@-28.25,-7.238 ; v1(2.2,-7.2) U4.19@3.548,-7.2
  L3 Signal X w0.117: v1(-29.8,-7.2) -25.901,-7.2 -25.218,-7.2 cw(c-25.218,-7.512) -24.906,-7.512 -24.906,-7.944 ccw(c-24.594,-7.944) -24.281,-7.944 -24.281,-7.056 cw(c-23.969,-7.056) -23.657,-7.056 -23.657,-8.013 ccw(c-23.345,-8.013) -23.032,-8.013 -23.032,-7.056 cw(c-22.72,-7.056) -22.408,-7.056 -22.408,-7.973 ccw(c-22.096,-7.973) -21.783,-7.973 -21.783,-7.056 cw(c-21.471,-7.056) -21.159,-7.056 -21.159,-8.087 ccw(c-20.847,-8.087) -20.534,-8.087 -20.534,-7.056 cw(c-20.222,-7.056) -19.91,-7.056 -19.91,-8.087 ccw(c-19.598,-8.087) -19.285,-8.087 -19.285,-7.056 cw(c-18.973,-7.056) -18.661,-7.056 -18.661,-7.944 ccw(c-18.349,-7.944) -18.036,-7.944 -18.036,-7.056 cw(c-17.724,-7.056) -17.412,-7.056 -17.412,-8.087 ccw(c-17.099,-8.087) -16.787,-8.087 -16.787,-7.056 cw(c-16.475,-7.056) -16.163,-7.056 -16.163,-8.087 ccw(c-15.85,-8.087) -15.538,-8.087 -15.538,-7.056 cw(c-15.226,-7.056) -14.914,-7.056 -14.914,-8.087 ccw(c-14.601,-8.087) -14.289,-8.087 -14.289,-7.056 cw(c-13.977,-7.056) -13.665,-7.056 -13.665,-7.534 ccw(c-13.352,-7.534) -13.04,-7.534 -13.04,-7.512 cw(c-12.728,-7.512) -12.728,-7.2 -9.693,-7.2 v1(2.2,-7.2)
ETH_RST: C53.2 IC1.138 U4.32 | length 65.9
  Top Layer (HSig) w0.128: IC1.138@-25.75,14.238 -25.744,14.232 -25.744,12.444 v1(-25.737,12.437) ; U4.32@7.749,-10.401 7.749,-12.959 C53.2@7.8,-13.01 7.8,-13.03 7.996,-13.226 8.351,-13.226 v1(8.65,-13.525)
  L3 Signal X w0.117: v1(-25.725,-13.375) -25.69,-13.375 -25.515,-13.2 0.375,-13.2 0.55,-13.375 2.15,-13.375 8.423,-13.375 8.573,-13.525 v1(8.65,-13.525)
  Bottom Layer (Y) w0.128: v1(-25.737,12.437) -25.731,12.431 -25.731,-13.369 v1(-25.725,-13.375)
ETH_RXD0: IC1.47 U4.16 | length 61.8
  Top Layer (HSig) w0.128: v1(-23.775,-9.025) -23.763,-9.013 -23.763,-7.25 IC1.47@-23.75,-7.238 ; U4.16@4.248,-5.499 4.248,-8.501 4.389,-8.642 v1(4.389,-8.715)
  L3 Signal X w0.117: v1(-23.775,-9.025) -10.55,-9.025 -10.492,-9.025 ccw(c-10.492,-8.713) -10.179,-8.713 -10.179,-8.275 cw(c-9.867,-8.275) -9.555,-8.275 -9.555,-11.491 ccw(c-9.243,-11.491) -8.93,-11.491 -8.93,-8.275 cw(c-8.618,-8.275) -8.306,-8.275 -8.306,-11.491 ccw(c-7.994,-11.491) -7.681,-11.491 -7.681,-8.275 cw(c-7.369,-8.275) -7.057,-8.275 -7.057,-11.491 ccw(c-6.745,-11.491) -6.432,-11.491 -6.432,-8.275 cw(c-6.12,-8.275) -5.808,-8.275 -5.808,-11.461 ccw(c-5.496,-11.461) -5.183,-11.461 -5.183,-9.027 cw(c-4.871,-9.027) -4.871,-8.715 -4.05,-8.715 v1(4.389,-8.715)
ETH_RXD1: IC1.48 U4.15 | length 61.5
  Top Layer (HSig) w0.128: IC1.48@-23.25,-7.238 -23.225,-7.213 -23.225,-6.025 v1(-23.2,-6) ; U4.15@4.749,-5.499 4.774,-5.525 4.774,-6.374 v1(4.8,-6.4)
  L3 Signal X w0.117: v1(-23.2,-6) -22.908,-6 -22.849,-6 ccw(c-22.849,-5.688) -22.537,-5.688 -22.537,-5.561 cw(c-22.225,-5.561) -21.913,-5.561 -21.913,-5.926 ccw(c-21.6,-5.926) -21.288,-5.926 -21.288,-5.561 cw(c-20.976,-5.561) -20.664,-5.561 -20.664,-5.926 ccw(c-20.351,-5.926) -20.039,-5.926 -20.039,-5.561 cw(c-19.727,-5.561) -19.415,-5.561 -19.415,-5.926 ccw(c-19.102,-5.926) -18.79,-5.926 -18.79,-5.561 cw(c-18.478,-5.561) -18.166,-5.561 -18.166,-5.926 ccw(c-17.853,-5.926) -17.541,-5.926 -17.541,-5.561 cw(c-17.229,-5.561) -16.917,-5.561 -16.917,-5.688 ccw(c-16.604,-5.688) -16.604,-6 -15.404,-6 -12.782,-6 -12.382,-6.4 -11.999,-6.4 -11.941,-6.4 ccw(c-11.941,-6.088) -11.629,-6.088 -11.629,-5.315 cw(c-11.317,-5.315) -11.004,-5.315 -11.004,-6.237 ccw(c-10.692,-6.237) -10.38,-6.237 -10.38,-5.287 cw(c-10.068,-5.287) -9.755,-5.287 -9.755,-6.237 ccw(c-9.443,-6.237) -9.131,-6.237 -9.131,-5.287 cw(c-8.818,-5.287) -8.506,-5.287 -8.506,-6.237 ccw(c-8.194,-6.237) -7.882,-6.237 -7.882,-5.287 cw(c-7.569,-5.287) -7.257,-5.287 -7.257,-6.237 ccw(c-6.945,-6.237) -6.633,-6.237 -6.633,-5.287 cw(c-6.32,-5.287) -6.008,-5.287 -6.008,-6.088 ccw(c-5.696,-6.088) -5.696,-6.4 -4.447,-6.4 ccw(c-4.447,-6.088) -4.135,-6.088 -4.135,-5.287 cw(c-3.822,-5.287) -3.51,-5.287 -3.51,-6.237 ccw(c-3.198,-6.237) -2.886,-6.237 -2.886,-5.287 cw(c-2.573,-5.287) -2.261,-5.287 -2.261,-6.237 ccw(c-1.949,-6.237) -1.637,-6.237 -1.637,-5.287 cw(c-1.324,-5.287) -1.012,-5.287 -1.012,-6.237 ccw(c-0.7,-6.237) -0.388,-6.237 -0.388,-5.287 cw(c-0.075,-5.287) 0.237,-5.287 0.237,-6.237 ccw(c0.549,-6.237) 0.861,-6.237 0.861,-5.798 cw(c1.174,-5.798) 1.486,-5.798 1.486,-6.088 ccw(c1.798,-6.088) 1.798,-6.4 2.79,-6.4 v1(4.8,-6.4)
ETH_TX_EN: IC1.124 U4.23 | length 67.4
  Top Layer (HSig) w0.128: IC1.124@-18.75,14.238 -18.725,14.213 -18.725,12.825 v1(-18.7,12.8) ; v1(-2.7,-9.2) U4.23@3.548,-9.2
  L3 Signal X w0.117: v1(-18.7,12.8) -10.799,12.8 -10.74,12.8 ccw(c-10.74,13.112) -10.428,13.112 -10.428,13.63 cw(c-10.116,13.63) -9.804,13.63 -9.804,12.891 ccw(c-9.491,12.891) -9.179,12.891 -9.179,13.63 cw(c-8.867,13.63) -8.555,13.63 -8.555,13.102 ccw(c-8.242,13.102) -7.93,13.102 -7.93,13.537 cw(c-7.618,13.537) -7.305,13.537 -7.305,12.891 ccw(c-6.993,12.891) -6.681,12.891 -6.681,13.112 cw(c-6.369,13.112) -6.056,13.112 ccw(c-5.744,13.112) -5.744,12.8 -4.225,12.8 v1(-2.7,12.8)
  Bottom Layer (Y) w0.128: v1(-2.7,-9.2) -2.7,1.7 -2.7,2.4 cw(c-2.382,2.4) -2.382,2.718 -1.789,2.718 ccw(c-1.789,3.036) -1.789,3.354 -2.515,3.354 cw(c-2.515,3.672) -2.515,3.99 -1.789,3.99 ccw(c-1.789,4.308) -1.789,4.626 -2.515,4.626 cw(c-2.515,4.945) -2.515,5.263 -1.789,5.263 ccw(c-1.789,5.581) -1.789,5.899 -2.515,5.899 cw(c-2.515,6.217) -2.515,6.535 -1.789,6.535 ccw(c-1.789,6.853) -1.789,7.171 -2.515,7.171 cw(c-2.515,7.489) -2.515,7.807 -1.789,7.807 ccw(c-1.789,8.125) -1.789,8.443 -2.515,8.443 cw(c-2.515,8.761) -2.515,9.079 -1.789,9.079 ccw(c-1.789,9.397) -1.789,9.715 -2.515,9.715 cw(c-2.515,10.033) -2.515,10.351 -1.789,10.351 ccw(c-1.789,10.669) -1.789,10.987 -2.382,10.987 cw(c-2.382,11.306) -2.7,11.306 -2.7,12.702 v1(-2.7,12.8)